# Altium PCB DIO_8SMA_8MCX.PcbDoc (part 6 of 9)
Units mm, origin at the board's own origin, x right, y up, seen from the top; angles counter-clockwise.
Board outline 222.9 x 100 mm, 6 copper layers (TopLayer, L2, L3, L4, L5, Bottom Layer), stack 1.492 mm thick; 542 components, 326 nets, 1968 pads, 1583 vias.
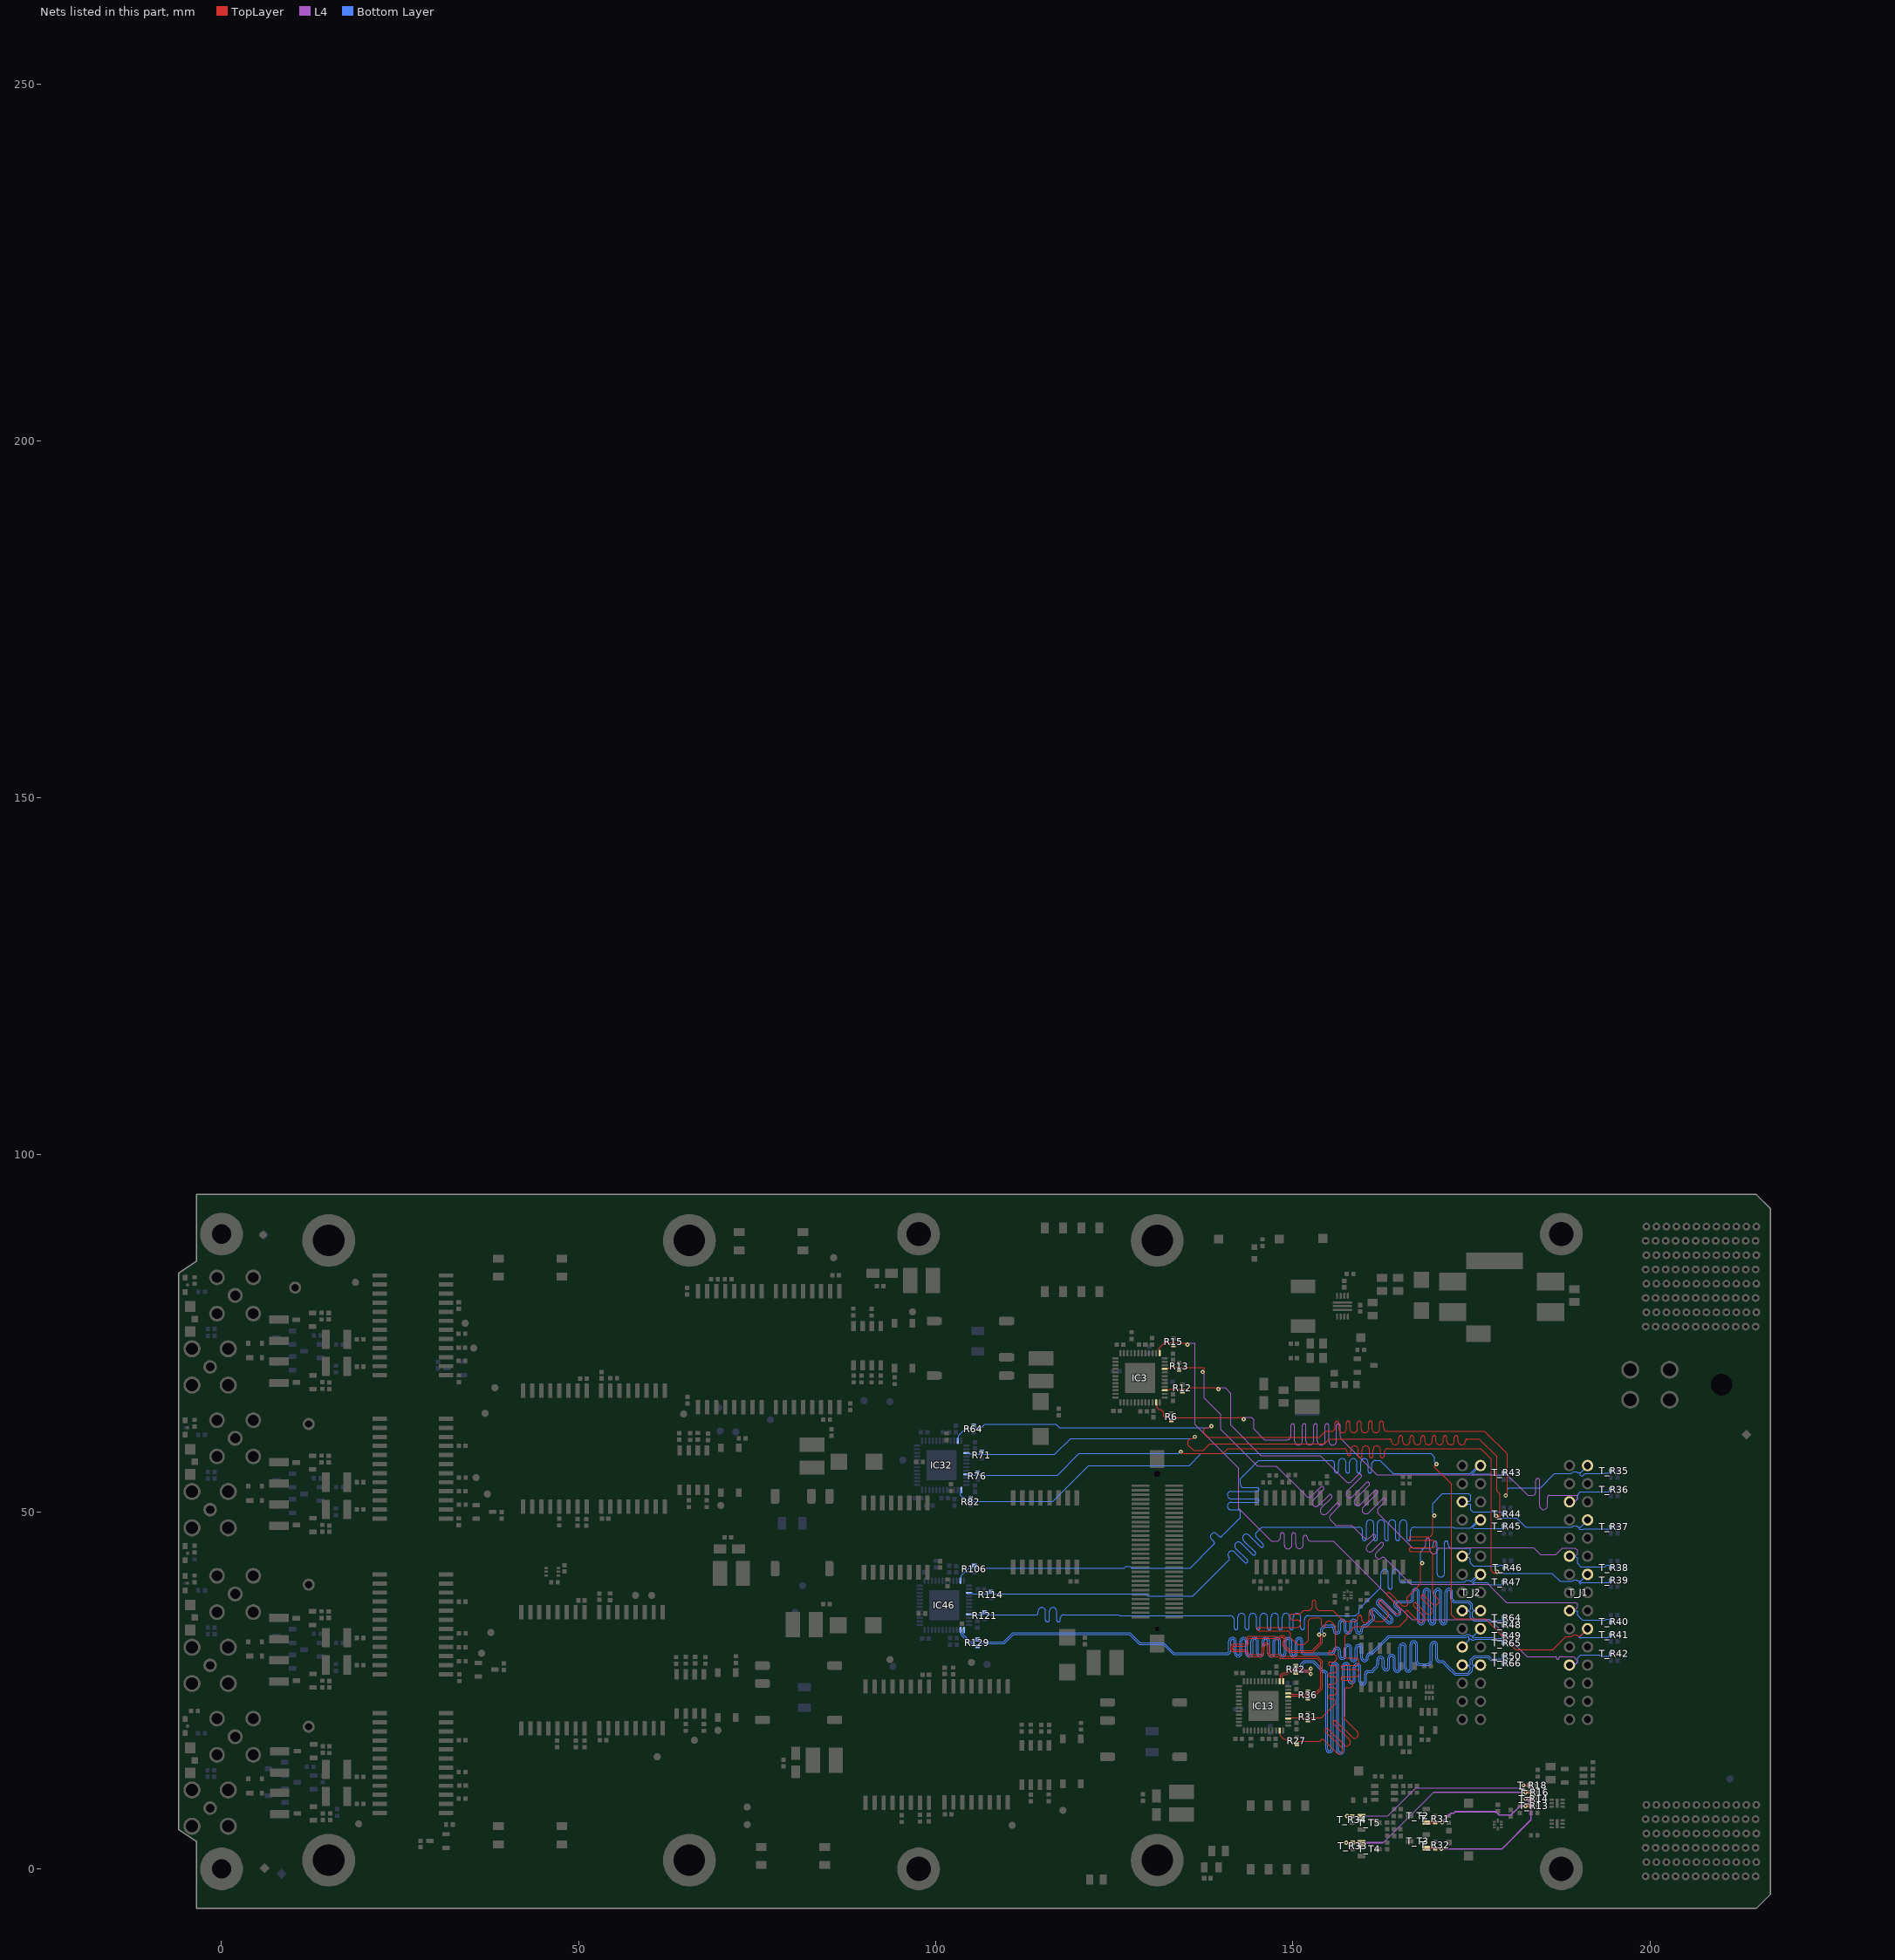
[diagram p9: the nets of this part, all layers, seen from the top]

## Via types
v1: diameter 0.6, hole 0.25, TopLayer to Bottom Layer, tented both sides, 1359 vias
v2: diameter 0.5, hole 0.2, TopLayer to Bottom Layer, tented both sides, 127 vias
v3: diameter 0.6, hole 0.3, TopLayer to Bottom Layer, tented both sides, 45 vias
v4: diameter 0.8, hole 0.3, TopLayer to Bottom Layer, tented both sides, 40 vias
v5: diameter 0.5, hole 0.25, TopLayer to Bottom Layer, tented both sides, 12 vias

## Nets (pads, with @x,y where several pads share a name; then routed paths per layer and width w, separated by ;. In a path a pad name is that pad's centre, name@x,y a point inside that pad or via, vN(x,y) a via of type N, cw(c..) or ccw(c..) an arc to the next point about the centre after c; other vN are vias at no path point) (continued)
EEM_IO.LVDS_N13: IC13.10 R36.2 T_J2.18 T_R64.2 | length 121.6
  TopLayer w0.116: 148.19,32.5 148.123,32.436 cw(c147.944,32.621) 147.762,32.438 147.719,32.481 147.639,32.561 147.611,32.561 143.792,32.561 143.539,32.308 143.539,32.303 143.539,31.717 cw(c143.281,31.717) 143.281,31.459 141.748,31.459 ccw(c141.748,30.94) 141.229,30.94 ccw(c141.748,30.94) 141.748,30.421 143.281,30.421 cw(c143.281,30.163) 143.539,30.163 143.539,30.092 143.657,29.974 143.892,29.739 145.245,29.739 145.433,29.739 ccw(c145.433,30.258) 145.952,30.258 145.952,31.088 cw(c146.21,31.088) 146.468,31.088 146.468,30.258 ccw(c146.987,30.258) 146.987,29.739 147.974,29.739 148,29.739 148.108,29.631 148.239,29.5 153.329,29.5 153.9,28.929 153.9,25.369 152.98,24.45 152.439,24.45 152.371,24.518 152.371,24.557 152.139,24.789 R36.2@152.119,24.789 152.099,24.789 151.867,24.557 151.867,24.518 151.799,24.45 151.19,24.45 149.81,24.449 149.69,24.569 IC13.10@149.35,24.569 ; 148.191,32.501 cw(c148.552,32.128) 148.925,32.489 cw(c148.552,32.128) 148.913,31.755 148.863,31.708 ccw(c149.043,31.522) 148.86,31.34 149.209,30.991 149.306,30.894 149.6,30.6 152.697,30.6 153.9,31.803 153.9,32.49 153.67,32.72 v1(153.67,32.8)
  Bottom Layer w0.116: v1(153.67,32.8) 153.67,32.88 153.9,33.11 153.9,33.63 154.43,34.161 154.661,34.161 155.386,34.161 cw(c155.386,33.642) 155.905,33.642 155.905,33.419 ccw(c156.163,33.419) 156.421,33.419 156.421,34.422 cw(c156.94,34.422) 157.459,34.422 157.459,33.419 ccw(c157.717,33.419) 157.975,33.419 157.975,34.422 ; 157.975,34.422 cw(c158.494,34.422) 159.013,34.422 159.013,33.419 ccw(c159.271,33.419) 159.529,33.419 159.529,33.642 cw(c160.048,33.642) 160.048,34.161 160.236,34.161 160.264,34.161 160.28,34.176 160.375,34.271 161.131,35.027 ccw(c160.948,35.209) 161.13,35.392 ; 161.13,35.393 160.937,35.585 cw(c161.304,35.952) 160.936,36.318 160.938,36.32 cw(c161.304,35.952) 161.671,36.319 163.342,34.649 ccw(c163.524,34.831) 163.707,34.649 ccw(c163.524,34.831) 163.707,35.014 161.825,36.895 cw(c162.192,37.262) 161.825,37.629 cw(c162.192,37.262) 162.559,37.629 164.44,35.748 ccw(c164.623,35.93) 164.805,35.748 ccw(c164.623,35.93) 164.805,36.112 164.243,36.675 cw(c164.61,37.042) 164.61,37.561 164.907,37.561 165.196,37.561 166.419,37.561 ccw(c166.419,37.819) 166.677,37.819 166.677,38.76 cw(c167.196,38.76) 167.715,38.76 167.715,34.703 ccw(c167.973,34.703) 168.231,34.703 168.231,38.76 cw(c168.75,38.76) 169.269,38.76 169.269,34.703 ccw(c169.527,34.703) 169.785,34.703 169.785,38.76 cw(c170.304,38.76) 170.823,38.76 170.823,34.703 ccw(c171.081,34.703) 171.338,34.703 171.338,38.76 cw(c171.857,38.76) 172.376,38.76 172.376,37.819 ccw(c172.634,37.819) 172.634,37.561 173.6,37.561 174.647,37.561 175.173,37.035 175.173,36.358 175.364,36.167 176.264,36.167 T_J2.18@176.27,36.16 ; 175.355,36.16 175.135,35.94 175.135,35.268 175.439,34.965 177.427,34.965 177.585,34.806 179.23,34.806 179.298,34.874 179.298,34.944 T_R64.2@179.53,35.176
EEM_IO.LVDS_N14: IC46.14 R129.2 T_J2.21 T_R65.2 | length 121.2
  Bottom Layer w0.116: IC46.14@103.459,33.461 103.459,33.121 103.579,33.001 103.579,32.698 104.744,31.533 105.485,31.533 105.826,31.191 R129.2@105.866,31.191 ; R129.2@105.846,31.191 R129.2@105.866,31.191 ; T_J2.21@173.73,31.08 174.683,32.033 ; T_R65.2@179.53,31.626 179.298,31.858 179.298,31.953 179.23,32.02 178.821,32.02 178.192,32.02 178.073,32.139 175.486,32.139 175.413,32.065 175.1,32.065 174.956,32.21 174.86,32.21 174.683,32.033 ; R129.2@105.866,31.191 106.098,31.423 106.098,31.463 106.166,31.531 109.6,31.531 110.885,32.815 127.085,32.815 128.492,31.408 131.823,31.408 133.231,30 140.588,30 140.776,30 ccw(c140.776,30.519) 141.295,30.519 141.295,31.895 cw(c141.553,31.895) 141.811,31.895 141.811,30.2 ccw(c142.33,30.2) 142.849,30.2 142.849,31.895 cw(c143.107,31.895) 143.365,31.895 143.365,30.2 ccw(c143.884,30.2) 144.403,30.2 144.403,31.895 cw(c144.661,31.895) 144.919,31.895 144.919,30.2 ccw(c145.438,30.2) 145.957,30.2 145.957,31.895 cw(c146.215,31.895) 146.473,31.895 146.473,30.2 ccw(c146.992,30.2) 147.511,30.2 147.511,31.895 cw(c147.769,31.895) 148.027,31.895 148.027,30.2 ccw(c148.546,30.2) 149.065,30.2 149.065,31.895 cw(c149.323,31.895) 149.581,31.895 149.581,30.2 ccw(c150.1,30.2) 150.619,30.2 150.619,31.895 cw(c150.877,31.895) 151.135,31.895 151.135,30.519 ccw(c151.654,30.519) 151.654,30 152.951,30 154.737,30 155.388,30 ccw(c155.388,30.519) 155.907,30.519 cw(c156.165,30.519) 156.423,30.519 156.423,29.839 ccw(c156.942,29.839) 157.461,29.839 157.461,30.914 cw(c157.719,30.914) 157.977,30.914 157.977,29.519 ccw(c158.496,29.519) 159.015,29.519 159.015,30.914 cw(c159.273,30.914) 159.531,30.914 159.531,29.519 ccw(c160.05,29.519) 160.569,29.519 160.569,29.742 cw(c160.827,29.742) 160.827,30 161.015,30 161.124,30 163.505,32.381 174.243,32.381 174.413,32.551 174.615,32.551 174.683,32.483 174.683,32.033
EEM_IO.LVDS_N15: IC13.14 R42.2 T_J2.24 T_R66.1 | length 122.6
  TopLayer w0.116: IC13.14@148.15,26.269 148.15,26.609 148.27,26.729 148.27,27.173 148.577,27.48 149.024,27.48 149.593,28.05 150.099,28.05 150.167,28.118 150.167,28.157 150.399,28.389 150.439,28.389 150.671,28.157 150.671,28.118 150.739,28.05 151.37,28.05 151.603,27.817 152.19,27.817 152.42,28.047 v1(152.5,28.047)
  Bottom Layer w0.116: v1(152.5,28.047) 152.42,28.047 152.19,27.817 151.671,27.817 151.373,28.114 151.373,28.573 151.7,28.9 152.8,28.9 153.658,28.042 153.716,27.984 154.176,27.524 154.347,27.524 cw(c154.347,27.266) 154.605,27.266 154.605,16.793 ccw(c155.124,16.793) 155.643,16.793 155.643,28.359 cw(c155.901,28.359) 156.159,28.359 156.159,16.592 ccw(c156.678,16.592) 157.197,16.592 157.197,28.359 cw(c157.455,28.359) 157.713,28.359 157.713,26.47 ccw(c158.232,26.47) 158.751,26.47 158.751,28.245 cw(c159.009,28.245) 159.267,28.245 159.267,26.251 ccw(c159.786,26.251) 160.305,26.251 160.305,27.266 cw(c160.563,27.266) 160.563,27.524 160.752,27.524 161.169,27.524 161.499,27.854 161.781,28.136 ; 161.781,28.136 ccw(c161.219,28.696) 162.013,28.696 162.013,29.245 cw(c162.271,29.245) 162.271,29.503 cw(c162.271,29.245) 162.529,29.245 162.529,28.247 ccw(c163.048,28.247) 163.048,27.728 ccw(c163.048,28.247) 163.567,28.247 163.567,29.523 cw(c163.825,29.523) 163.825,29.781 cw(c163.825,29.523) 164.083,29.523 164.083,28.047 ccw(c164.602,28.047) 164.602,27.528 ccw(c164.602,28.047) 165.121,28.047 165.121,31.077 cw(c165.379,31.077) 165.379,31.335 cw(c165.379,31.077) 165.637,31.077 165.637,28.069 ccw(c166.156,28.069) 166.156,27.55 ccw(c166.156,28.069) 166.675,28.069 166.675,31.432 cw(c166.933,31.432) 166.933,31.69 cw(c166.933,31.432) 167.191,31.432 167.191,29.019 ccw(c167.71,29.019) 167.71,28.5 168.06,28.5 168.303,28.5 168.807,28.5 169.069,28.5 169.362,28.793 ccw(c168.995,29.16) 169.514,29.16 169.514,31.32 cw(c169.772,31.32) 170.03,31.32 170.03,29.417 ccw(c170.549,29.417) 170.549,28.898 170.933,28.898 171.457,28.373 171.631,28.2 172.692,27.139 174.578,27.139 175.131,27.692 175.131,28.2 175.364,28.433 176.164,28.433 T_J2.24@176.27,28.54 175.199,28.54 175.131,28.608 175.131,29.2 175.531,29.6 177.3,29.6 177.731,29.169 179.23,29.169 179.298,29.102 179.298,29.032 T_R66.1@179.53,28.8
EEM_IO.LVDS_P0: IC32.47 R64.1 T_J1.2 T_R35.2 | length 120.9
  TopLayer w0.116: v1(138.599,62.02) 138.519,62.02 138.289,61.79 138.158,61.79 138.157,61.791 137.746,61.791 137.526,61.571 137.526,61.035 138.137,60.424 153.724,60.424 154.6,61.3 155.233,61.3 155.421,61.3 ccw(c155.421,61.819) 155.94,61.819 155.94,62.447 cw(c156.198,62.447) 156.456,62.447 156.456,61.605 ccw(c156.975,61.605) 157.494,61.605 157.494,62.447 cw(c157.752,62.447) 158.01,62.447 158.01,61.605 ccw(c158.529,61.605) 159.048,61.605 159.048,62.447 cw(c159.306,62.447) 159.564,62.447 159.564,61.605 ccw(c160.083,61.605) 160.602,61.605 160.602,62.447 cw(c160.86,62.447) 161.118,62.447 161.118,61.605 ccw(c161.637,61.605) 162.156,61.605 162.156,62.447 cw(c162.414,62.447) 162.672,62.447 162.672,61.819 ccw(c163.191,61.819) 163.191,61.3 165.711,61.3 176.828,61.3 180.028,58.1 180.028,52.61 179.799,52.38 v1(179.799,52.3)
  Bottom Layer w0.116: IC32.47@103.093,59.958 103.093,60.299 103.212,60.418 103.212,60.69 104.252,61.731 104.98,61.731 105.048,61.798 105.048,61.838 105.28,62.07 R64.1@105.3,62.07 105.32,62.07 105.552,61.838 105.552,61.798 105.62,61.731 106.3,61.731 106.87,62.3 116.8,62.3 117.31,61.79 137.788,61.79 138.289,61.79 138.519,62.02 v1(138.599,62.02) ; v1(179.799,52.3) 179.828,52.3 180.028,52.5 ; v1@180.028,52.417 180.028,52.5 ; T_J1.2@191.27,56.48 190.287,55.497 ; T_R35.2@194.53,55.75 194.298,55.518 194.298,55.473 194.23,55.405 193.727,55.405 193.68,55.359 190.937,55.359 190.557,54.979 190.415,54.979 190.247,55.147 190.247,55.457 190.287,55.497 ; 180.028,52.5 180.028,53.14 180.249,53.361 184.679,53.361 186.669,55.351 188.984,55.351 189.275,55.642 189.753,55.642 189.897,55.497 190.287,55.497
EEM_IO.LVDS_P1: IC3.47 R6.1 T_J1.5 T_R36.2 | length 107.5
  TopLayer w0.116: IC3.47@130.858,65.317 130.858,64.976 130.978,64.857 130.978,64.585 131.199,64.364 131.467,64.364 131.881,63.95 131.881,63.457 132.168,63.17 132.68,63.17 132.748,63.102 132.748,63.062 132.98,62.83 R6.1@133,62.83 133.02,62.83 133.252,63.062 133.252,63.102 133.32,63.17 142.289,63.17 142.349,63.23 142.79,63.23 143.02,63 v1(143.1,63)
  L4 w0.127: v1(143.1,63) 143.187,63 143.411,63.224 144.191,63.224 144.528,62.887 144.528,61.616 146.044,60.1 148.985,60.1 149.184,60.1 ccw(c149.184,60.635) 149.72,60.635 149.72,62.062 cw(c149.983,62.062) 149.983,62.325 cw(c149.983,62.062) 150.247,62.062 150.247,59.894 ccw(c150.782,59.894) 150.782,59.358 ccw(c150.782,59.894) 151.318,59.894 151.318,62.062 cw(c151.581,62.062) 151.581,62.325 cw(c151.581,62.062) 151.845,62.062 151.845,59.894 ccw(c152.38,59.894) 152.38,59.358 ccw(c152.38,59.894) 152.916,59.894 152.916,62.062 cw(c153.179,62.062) 153.179,62.325 cw(c153.179,62.062) 153.443,62.062 153.443,59.894 ccw(c153.978,59.894) 153.978,59.358 ccw(c153.978,59.894) 154.514,59.894 154.514,62.062 cw(c154.777,62.062) 154.777,62.325 cw(c154.777,62.062) 155.041,62.062 155.041,59.894 ccw(c155.576,59.894) 155.576,59.358 ccw(c155.576,59.894) 156.112,59.894 156.112,62.062 cw(c156.375,62.062) 156.375,62.325 cw(c156.375,62.062) 156.639,62.062 156.639,60.583 ccw(c157.174,60.583) 156.796,60.204 157.575,59.425 157.705,59.295 161.804,55.196 180.004,55.196 181.8,53.4 182.9,52.3 183.305,52.3 183.504,52.3 ccw(c183.504,52.836) 184.04,52.836 184.04,54.41 cw(c184.303,54.41) 184.303,54.673 cw(c184.303,54.41) 184.567,54.41 184.567,50.842 ccw(c185.102,50.842) 185.102,50.306 ccw(c185.102,50.842) 185.638,50.842 185.638,52.037 cw(c185.901,52.037) 185.901,52.3 186.954,52.3 189.79,52.3 189.864,52.226 189.864,51.8 189.646,51.582 188.912,51.582 T_J1.5@188.73,51.4
  Bottom Layer w0.116: T_J1.5@188.73,51.4 188.897,51.567 189.636,51.567 189.87,51.8 189.87,52.408 190.252,52.791 194.227,52.791 194.295,52.859 194.295,52.889 T_R36.2@194.527,53.121
EEM_IO.LVDS_P2: IC32.3 R71.1 T_J1.8 T_R37.2 | length 120.7
  TopLayer w0.116: v1(136.3,60.5) 136.22,60.5 135.99,60.271 135.657,60.271 135.344,59.958 135.344,59.37 136.123,58.592 137.471,58.592 138.403,59.524 154.424,59.524 155.1,60.2 162.804,60.2 163.555,60.2 cw(c163.555,59.942) 163.813,59.942 163.813,59.925 ccw(c164.332,59.925) 164.851,59.925 164.851,60.408 cw(c165.109,60.408) 165.367,60.408 165.367,59.91 ccw(c165.886,59.91) 166.405,59.91 166.405,60.408 cw(c166.663,60.408) 166.921,60.408 166.921,59.91 ccw(c167.44,59.91) 167.959,59.91 167.959,60.408 cw(c168.217,60.408) 168.475,60.408 168.475,59.91 ccw(c168.994,59.91) 169.513,59.91 169.513,60.408 cw(c169.771,60.408) 170.029,60.408 170.029,59.91 ccw(c170.548,59.91) 171.067,59.91 171.067,60.408 cw(c171.325,60.408) 171.583,60.408 171.583,59.91 ccw(c172.102,59.91) 172.621,59.91 172.621,60.408 cw(c172.879,60.408) 173.137,60.408 173.137,59.91 ccw(c173.656,59.91) 174.175,59.91 174.175,59.942 cw(c174.433,59.942) 174.433,60.2 174.621,60.2 176.1,60.2 178.554,57.746 178.554,52.946 179,52.5 179,49.371 179.009,49.362 179.009,49.229 178.941,49.161 178.81,49.161 178.58,49.391 v1(178.5,49.391)
  Bottom Layer w0.116: IC32.3@104.293,58.258 104.633,58.258 104.753,58.139 105.326,58.139 105.419,58.046 106.008,58.046 ; R71.1@106.154,58.191 106.008,58.046 ; R71.1@106.191,58.153 106.191,58.114 106.123,58.046 106.008,58.046 ; R71.1@106.443,58.385 106.463,58.385 106.695,58.153 106.695,58.114 106.763,58.046 116.646,58.046 118.871,60.271 135.99,60.271 136.22,60.5 v1(136.3,60.5) ; v1(178.5,49.391) 178.631,49.391 178.86,49.161 181.339,49.161 182.618,47.882 189.135,47.882 189.285,48.032 189.743,48.032 189.887,47.887 190.297,47.887 ; T_J1.8@191.27,48.86 190.297,47.887 ; T_R37.2@194.53,47.9 194.53,47.88 194.23,47.58 194.053,47.58 193.996,47.637 190.697,47.637 190.625,47.565 190.209,47.565 190.14,47.634 190.14,47.73 190.297,47.887
EEM_IO.LVDS_P3: IC3.3 R12.1 T_J1.11 T_R38.2 | length 106.4
  TopLayer w0.116: IC3.3@132.058,67.017 132.399,67.017 132.518,67.136 133.721,67.136 133.812,67.227 134.222,67.227 134.29,67.159 134.29,67.12 134.522,66.888 R12.1@134.542,66.888 134.562,66.888 134.794,67.12 134.794,67.159 134.862,67.227 135.215,67.227 135.393,67.406 139.29,67.406 139.52,67.176 v1(139.6,67.176)
  L4 w0.127: v1(139.6,67.176) 139.676,67.176 139.9,67.4 140.5,67.4 141.328,66.572 141.328,62.128 145.556,57.9 153.815,57.9 157.315,54.4 157.417,54.299 157.456,54.26 ccw(c157.835,54.638) 158.214,54.259 159.172,55.217 ; 159.172,55.218 cw(c159.359,55.031) 159.545,55.218 cw(c159.359,55.031) 159.545,54.845 157.559,52.859 157.559,52.854 ccw(c157.977,52.52) 158.356,52.141 160.302,54.087 cw(c160.489,53.901) 160.675,54.088 cw(c160.489,53.901) 160.675,53.715 158.689,51.729 158.689,51.724 ccw(c159.107,51.39) 159.486,51.011 161.432,52.957 cw(c161.619,52.771) 161.805,52.958 cw(c161.619,52.771) 161.805,52.585 159.819,50.599 159.819,50.594 ccw(c160.237,50.26) 160.616,49.881 162.562,51.827 ; 162.562,51.828 cw(c162.749,51.641) 162.935,51.828 cw(c162.749,51.641) 162.935,51.455 161.976,50.496 ccw(c162.355,50.118) 161.977,49.738 162.606,49.109 162.708,49.008 166.787,44.928 167.908,44.928 168.107,44.928 ccw(c168.107,45.463) 168.643,45.463 168.643,46.05 cw(c168.906,46.05) 168.906,46.313 cw(c168.906,46.05) 169.17,46.05 169.17,44.664 ccw(c169.705,44.664) 169.705,44.129 ccw(c169.705,44.664) 170.241,44.664 cw(c170.504,44.665) 170.504,44.928 172.142,44.928 174.213,44.928 174.263,44.978 183.709,44.978 184.687,44 186.827,44 187.74,44.913 189.541,44.913 189.864,44.59 189.864,44.1 189.721,43.957 188.907,43.957 T_J1.11@188.73,43.78
  Bottom Layer w0.116: T_J1.11@188.73,43.78 188.777,43.733 189.636,43.733 189.87,43.5 189.87,42.761 190.302,42.329 193.729,42.329 193.933,42.532 194.23,42.532 194.298,42.464 194.298,42.432 T_R38.2@194.53,42.2
EEM_IO.LVDS_P4: IC32.9 R76.1 T_J1.14 T_R39.2 | length 120.7
  TopLayer w0.116: v1(134.3,58.42) 134.38,58.42 134.61,58.19 140.197,58.19 140.868,58.861 156.331,58.861 157.096,58.861 cw(c157.096,58.342) 157.615,58.342 157.615,58.129 ccw(c157.873,58.129) 158.131,58.129 158.131,58.7 cw(c158.65,58.7) 159.169,58.7 159.169,57.825 ccw(c159.427,57.825) 159.685,57.825 159.685,58.7 cw(c160.204,58.7) 160.723,58.7 160.723,57.825 ccw(c160.981,57.825) 161.238,57.825 161.238,58.7 cw(c161.757,58.7) 162.276,58.7 162.276,57.825 ccw(c162.534,57.825) 162.792,57.825 162.792,58.342 cw(c163.311,58.342) 163.311,58.861 163.5,58.861 176.308,58.861 177.8,57.369 177.8,41.75 178.159,41.39 178.29,41.39 178.52,41.62 v1(178.6,41.62)
  Bottom Layer w0.116: IC32.9@104.293,55.258 104.633,55.258 104.753,55.139 105.523,55.139 105.591,55.207 105.591,55.246 105.823,55.478 R76.1@105.843,55.478 ; R76.1@106.038,55.303 106.095,55.246 106.095,55.207 106.163,55.139 117.039,55.139 120.09,58.19 133.99,58.19 134.22,58.42 v1(134.3,58.42) ; v1(178.6,41.62) 178.68,41.62 178.91,41.39 186.279,41.39 187.407,40.262 189.135,40.262 189.345,40.472 189.683,40.472 189.802,40.353 190.342,40.353 ; T_J1.14@191.27,41.24 190.14,40.11 190.14,40.014 190.208,39.946 190.304,39.946 190.439,40.08 194.23,40.08 194.298,40.148 194.298,40.243 T_R39.2@194.53,40.475
EEM_IO.LVDS_P5: IC3.9 R13.1 T_J1.17 T_R40.2 | length 105.6
  TopLayer w0.116: IC3.9@132.058,70.017 132.399,70.017 132.518,70.136 133.017,70.136 133.15,70.269 133.78,70.269 133.848,70.202 133.848,70.162 134.08,69.93 R13.1@134.1,69.93 ; R13.1@134.372,70.209 137.542,70.209 137.61,70.141 137.61,69.91 137.38,69.68 v1(137.38,69.6)
  L4 w0.127: v1(137.38,69.6) 137.38,69.513 137.604,69.289 137.604,65.911 139.92,63.595 139.92,61.559 145.051,56.428 147.672,56.428 151.75,52.35 151.891,52.209 ccw(c152.27,52.587) 152.649,52.209 153.915,53.475 cw(c154.101,53.288) 154.288,53.475 cw(c154.101,53.288) 154.288,53.103 152.849,51.664 ccw(c153.228,51.285) 152.849,50.907 ; 152.85,50.906 ccw(c153.228,51.285) 153.607,50.907 ; 153.607,50.907 155.045,52.345 cw(c155.231,52.158) 155.417,52.345 cw(c155.231,52.158) 155.418,51.973 153.979,50.534 ccw(c154.358,50.155) 153.979,49.777 ccw(c154.358,50.155) 154.737,49.777 156.117,51.157 cw(c156.303,50.97) 156.489,51.157 cw(c156.303,50.97) 156.489,50.784 155.281,49.576 ccw(c155.66,49.197) 155.281,48.819 155.83,48.27 155.98,48.12 158.258,48.12 159.857,46.521 159.958,46.42 159.997,46.381 ccw(c160.376,46.759) 160.755,46.38 161.152,46.777 ; 161.152,46.778 cw(c161.339,46.591) 161.525,46.778 cw(c161.339,46.591) 161.525,46.405 160.381,45.261 160.381,45.256 ccw(c160.799,44.922) 161.178,44.543 162.265,45.63 cw(c162.451,45.444) 162.637,45.63 cw(c162.451,45.444) 162.637,45.257 161.693,44.313 ccw(c162.071,43.934) 161.693,43.555 ccw(c162.071,43.934) 162.45,43.555 cw(c162.636,43.369) 162.823,43.555 163.211,43.167 163.313,43.066 166.552,39.826 177.389,39.826 177.708,39.508 179.915,37.3 182.996,37.3 186.762,37.3 189.643,37.3 189.864,37.079 189.864,36.6 189.646,36.382 188.952,36.382 T_J1.17@188.73,36.16
  Bottom Layer w0.116: T_J1.17@188.73,36.16 189.802,36.16 189.87,36.092 189.87,35.53 190.571,34.829 193.729,34.829 193.844,34.944 194.23,34.944 194.298,34.877 194.298,34.832 T_R40.2@194.53,34.6
EEM_IO.LVDS_P6: IC32.13 R82.1 T_J1.20 T_R41.2 | length 122.9
  TopLayer w0.116: v1(170.1,56.7) 170.1,56.62 169.871,56.39 169.871,56.229 172.2,53.9 172.2,35.6 172.8,35 176.9,35 181.2,30.7 186.41,30.7 188.23,32.52 189.014,32.52 189.255,32.762 189.773,32.762 189.917,32.617 190.267,32.617 T_J1.20@191.27,33.62
  Bottom Layer w0.116: IC32.13@103.593,53.058 103.593,52.718 103.473,52.598 103.473,52.327 103.703,52.097 103.889,52.097 104.169,51.817 104.169,51.571 104.237,51.503 104.588,51.503 104.656,51.571 104.656,51.576 104.888,51.808 104.928,51.808 105.16,51.576 105.16,51.537 105.228,51.469 116.4,51.469 121.431,56.5 135.5,56.5 137.175,58.175 169.325,58.175 169.847,57.653 169.847,57.01 170.076,56.78 170.1,56.78 v1(170.1,56.7) ; T_J1.20@191.27,33.62 190.14,32.49 190.14,32.394 190.208,32.326 190.304,32.326 190.366,32.388 194.142,32.388 194.225,32.471 194.225,32.475 T_R41.2@194.53,32.78
EEM_IO.LVDS_P7: IC3.13 R15.1 T_J1.23 T_R42.2 | length 105.9
  TopLayer w0.116: IC3.13@131.358,72.217 131.358,72.557 131.239,72.677 131.239,72.9 132.039,73.7 132.631,73.7 132.662,73.669 132.98,73.669 133.048,73.602 133.048,73.562 133.28,73.33 133.32,73.33 133.552,73.562 133.552,73.602 133.62,73.669 134.246,73.669 134.273,73.642 134.918,73.642 135.148,73.412 v1(135.228,73.412)
  L4 w0.127: v1(135.228,73.412) 135.315,73.412 135.55,73.647 136.226,73.647 136.3,73.573 136.3,72.458 136.3,62.234 142.428,56.106 142.428,50.459 146.987,45.9 147.54,45.9 147.74,45.9 ccw(c147.74,46.435) 148.275,46.435 148.275,46.801 cw(c148.539,46.801) 148.539,47.064 cw(c148.539,46.801) 148.802,46.801 148.802,45.363 ccw(c149.338,45.363) 149.338,44.827 ccw(c149.338,45.363) 149.873,45.363 149.873,46.801 cw(c150.137,46.801) 150.137,47.064 cw(c150.137,46.801) 150.4,46.801 150.4,45.4 ccw(c150.936,45.4) 150.936,44.865 ccw(c150.936,45.4) 151.471,45.4 151.471,46.436 cw(c151.735,46.436) 151.735,46.699 cw(c151.735,46.436) 151.998,46.436 ccw(c152.534,46.435) 152.534,45.9 153.184,45.9 155.7,45.9 166.695,34.905 177.595,34.905 178.2,34.3 182.8,29.7 186.374,29.7 186.765,29.7 cw(c186.765,29.537) 186.928,29.537 186.928,29.5 ccw(c187.092,29.5) 187.255,29.5 187.255,29.537 cw(c187.419,29.537) 187.419,29.7 187.665,29.7 189.3,29.7 189.684,29.316 189.864,29.136 189.864,28.9 189.646,28.682 188.872,28.682 T_J1.23@188.73,28.54
  Bottom Layer w0.116: T_J1.23@188.73,28.54 188.957,28.767 189.636,28.767 189.87,29 189.87,29.52 190.293,29.943 192.92,29.943 193.065,29.799 194.213,29.799 194.278,29.864 194.298,29.864 194.53,30.096 T_R42.2@194.53,30.116
EEM_IO.LVDS_P8: IC46.47 R106.1 T_J2.2 T_R43.2 | length 122.3
  Bottom Layer w0.116: IC46.47@103.459,40.361 103.459,40.702 103.579,40.821 103.579,41.054 104.655,42.13 105.08,42.13 105.148,42.198 105.148,42.238 105.38,42.47 R106.1@105.4,42.47 105.42,42.47 105.652,42.238 105.652,42.198 105.72,42.13 126.385,42.13 126.594,42.339 127.206,42.339 127.415,42.13 135.631,42.13 138.825,45.325 138.958,45.458 ccw(c138.776,45.64) 138.958,45.823 138.604,46.177 cw(c138.971,46.544) 138.604,46.911 cw(c138.971,46.544) 139.338,46.911 139.692,46.557 ccw(c139.874,46.739) 140.057,46.557 140.543,47.043 142.378,48.878 142.621,49.121 142.639,49.139 142.639,50.022 ccw(c142.381,50.022) 142.381,50.28 141.357,50.28 cw(c141.357,50.799) 141.357,51.318 145.008,51.318 ccw(c145.008,51.576) 145.008,51.834 141.357,51.834 cw(c141.357,52.353) 141.357,52.872 145.008,52.872 ccw(c145.008,53.13) 145.008,53.388 143.158,53.388 cw(c143.158,53.907) 142.639,53.907 142.639,54.095 142.639,54.608 145.231,57.2 153.773,57.2 155.351,57.2 cw(c155.351,56.681) 155.87,56.681 155.87,55.7 ccw(c156.128,55.7) 156.386,55.7 156.386,56.923 cw(c156.905,56.923) 157.424,56.923 157.424,55.7 ccw(c157.682,55.7) 157.94,55.7 157.94,56.923 cw(c158.459,56.923) 158.978,56.923 158.978,55.7 ccw(c159.236,55.7) 159.494,55.7 159.494,56.923 cw(c160.013,56.923) 160.532,56.923 160.532,55.7 ccw(c160.79,55.7) 161.048,55.7 161.048,56.681 cw(c161.567,56.681) 161.567,57.2 161.756,57.2 162.203,57.2 164.042,55.361 174.823,55.361 175.942,56.48 T_J2.2@176.27,56.48 175.14,55.35 175.14,55.254 175.208,55.186 175.304,55.186 175.418,55.3 177.706,55.3 177.9,55.106 178.73,55.106 179.23,55.106 179.298,55.174 179.298,55.244 T_R43.2@179.53,55.476
EEM_IO.LVDS_P9: IC13.47 R27.1 T_J2.5 T_R44.2 | length 122.6
  TopLayer w0.116: IC13.47@148.15,19.369 148.15,19.029 148.27,18.909 148.27,18.572 148.684,18.158 149.119,18.158 149.45,17.826 150.185,17.826 150.528,17.483 R27.1@150.548,17.483 150.568,17.483 150.8,17.715 150.8,17.755 150.906,17.861 153.055,17.861 153.761,17.861 153.935,18.035 cw(c154.117,17.852) 154.3,18.034 ; 154.3,18.034 156.077,16.258 ccw(c156.444,16.625) 156.811,16.258 ccw(c156.444,16.625) 156.811,16.992 154.593,19.21 cw(c154.775,19.392) 154.593,19.574 cw(c154.775,19.392) 154.958,19.574 157.175,17.357 ccw(c157.542,17.724) 157.908,17.355 157.911,17.358 ccw(c157.542,17.724) 157.909,18.091 155.692,20.308 cw(c155.874,20.491) 155.692,20.673 cw(c155.874,20.491) 156.056,20.673 158.274,18.455 ccw(c158.641,18.822) 159.007,18.454 159.009,18.456 ccw(c158.641,18.822) 159.008,19.189 157.231,20.966 cw(c157.414,21.149) 157.231,21.331 157.3,21.4 157.3,21.529 157.3,24.236 157.3,25.112 cw(c157.558,25.112) 157.558,25.37 157.903,25.37 ccw(c157.903,25.889) 157.903,26.408 157.023,26.408 cw(c157.023,26.666) 157.023,26.924 158.755,26.924 ccw(c158.755,27.443) 158.755,27.962 157.023,27.962 cw(c157.023,28.22) 157.023,28.478 158.755,28.478 ccw(c158.755,28.997) 158.755,29.516 157.558,29.516 cw(c157.558,29.774) 157.3,29.774 157.3,29.962 157.3,32.639 158.598,33.937 164.906,33.937 164.946,33.977 165.041,34.072 165.893,34.924 ccw(c165.526,35.291) 165.931,35.615 165.931,35.62 165.893,35.657 ; 165.893,35.658 165.818,35.733 cw(c166,35.916) 165.818,36.098 cw(c166,35.916) 166.183,36.098 167.599,34.682 ccw(c167.966,35.049) 168.331,34.681 168.334,34.683 ccw(c167.966,35.049) 168.333,35.416 166.916,36.832 cw(c167.099,37.014) 166.916,37.197 cw(c167.099,37.014) 167.281,37.197 168.697,35.781 ccw(c169.064,36.148) 169.43,35.78 169.432,35.782 ccw(c169.064,36.148) 169.431,36.515 168.015,37.931 cw(c168.198,38.113) 168.015,38.296 cw(c168.198,38.113) 168.38,38.296 169.561,37.115 ccw(c169.928,37.482) 170.294,37.114 170.296,37.116 ccw(c169.928,37.482) 170.295,37.849 169.726,38.418 cw(c170.103,38.794) 169.571,38.795 169.571,38.93 169.571,43.209 169.571,43.942 ccw(c169.052,43.942) 169.052,44.461 166.532,44.461 cw(c166.532,44.719) 166.532,44.977 169.523,44.977 ccw(c169.523,45.496) 169.523,46.015 166.532,46.015 cw(c166.532,46.273) 166.532,46.531 169.052,46.531 ccw(c169.052,47.05) 169.571,47.05 169.571,48.016 169.571,49.19 169.8,49.42 v1(169.8,49.5)
  Bottom Layer w0.116: v1(169.8,49.5) 169.8,49.58 169.571,49.81 169.571,51.171 170.971,52.571 174.636,52.571 174.902,52.306 174.902,51.635 174.733,51.467 173.797,51.467 T_J2.5@173.73,51.4 174.014,51.116 174.774,51.116 174.918,50.972 174.918,50.313 175.232,49.999 179.251,49.999 179.53,49.72 T_R44.2@179.53,49.7
EEM_IO.LVDS_P10: IC46.3 R114.1 T_J2.8 T_R45.2 | length 121.9
  Bottom Layer w0.116: IC46.3@104.659,38.661 105,38.661 105.169,38.492 107.426,38.492 107.494,38.56 107.494,38.599 107.726,38.831 R114.1@107.746,38.831 107.766,38.831 107.998,38.599 107.998,38.56 108.066,38.492 129.408,38.492 129.7,38.2 136,38.2 140.459,42.659 141.071,43.271 ccw(c140.888,43.453) 141.071,43.636 cw(c141.438,44.003) 141.071,44.37 cw(c141.438,44.003) 141.805,44.37 143.25,42.924 ccw(c143.433,43.107) 143.615,43.289 142.013,44.891 cw(c142.379,45.259) 142.012,45.626 cw(c142.379,45.259) 142.703,45.664 142.708,45.664 144.364,44.008 ccw(c144.545,44.192) 144.727,44.009 ccw(c144.545,44.192) 144.727,44.375 143.111,45.99 cw(c143.478,46.358) 143.111,46.725 cw(c143.478,46.358) 143.802,46.763 143.807,46.763 145.462,45.107 ccw(c145.644,45.29) 145.827,45.108 ccw(c145.644,45.29) 145.826,45.473 ; 145.826,45.474 144.917,46.382 cw(c145.284,46.75) 144.917,47.117 145.05,47.25 145.661,47.861 158.286,47.861 159.253,47.861 cw(c159.253,47.342) 159.772,47.342 159.772,46.213 ccw(c160.03,46.213) 160.288,46.213 160.288,48.342 cw(c160.807,48.342) 161.326,48.342 161.326,46.213 ccw(c161.584,46.213) 161.842,46.213 161.842,48.342 cw(c162.361,48.342) 162.88,48.342 162.88,46.213 ccw(c163.138,46.213) 163.396,46.213 163.396,48.342 cw(c163.915,48.342) 164.434,48.342 164.434,46.213 ccw(c164.692,46.213) 164.95,46.213 164.95,48.342 cw(c165.469,48.342) 165.988,48.342 165.988,46.213 ccw(c166.246,46.213) 166.504,46.213 166.504,47.342 cw(c167.023,47.342) 167.023,47.861 167.212,47.861 172.494,47.861 172.609,47.746 174.828,47.746 175.942,48.86 T_J2.8@176.27,48.86 175.245,47.835 175.245,47.739 175.313,47.671 179.245,47.671 179.53,47.956 T_R45.2@179.53,47.976
EEM_IO.LVDS_P11: IC13.3 R31.1 T_J2.11 T_R46.2 | length 122.3
  TopLayer w0.116: IC13.3@149.35,21.069 149.69,21.069 149.81,21.188 151.715,21.188 151.833,21.07 151.867,21.07 R31.1@152.109,20.828 ; R31.1@152.119,20.838 152.139,20.838 152.371,21.07 152.371,21.11 152.439,21.178 154.047,21.178 155.969,23.1 156,23.131 156,23.289 ccw(c155.481,23.289) 155.481,23.808 155.258,23.808 cw(c155.258,24.066) 155,24.066 cw(c155.258,24.066) 155.258,24.324 155.619,24.324 ccw(c155.619,24.842) 156.138,24.842 ccw(c155.619,24.842) 155.619,25.361 155.258,25.361 cw(c155.258,25.619) 155,25.619 cw(c155.258,25.619) 155.258,25.877 155.619,25.877 ccw(c155.619,26.396) 156.138,26.396 ccw(c155.619,26.396) 155.619,26.915 155.258,26.915 cw(c155.258,27.173) 155,27.173 cw(c155.258,27.173) 155.258,27.431 155.619,27.431 ccw(c155.619,27.95) 156.138,27.95 ccw(c155.619,27.95) 155.619,28.469 155.258,28.469 cw(c155.258,28.727) 155,28.727 cw(c155.258,28.727) 155.258,28.985 155.619,28.985 ccw(c155.619,29.504) 156.138,29.504 ccw(c155.619,29.504) 155.619,30.023 155.258,30.023 cw(c155.258,30.281) 155,30.281 cw(c155.258,30.281) 155.258,30.539 155.481,30.539 ccw(c155.481,31.058) 156,31.058 156,31.735 156,31.977 156,33.969 155.797,34.172 155.436,34.533 ccw(c155.069,34.166) 154.55,34.166 154.55,34.162 cw(c154.292,34.162) 154.292,33.904 cw(c154.292,34.162) 154.034,34.162 154.034,34.642 ccw(c153.515,34.642) 153.515,35.161 152.553,35.161 152.549,35.157 152.2,34.808 152.2,32 151.6,31.4 150.669,31.4 149.7,32.369 149.7,32.607 149.7,32.795 ccw(c149.181,32.795) 149.181,33.314 145.282,33.314 cw(c145.282,33.572) 145.282,33.83 150.559,33.83 ccw(c150.559,34.349) 150.559,34.868 149.958,34.868 cw(c149.958,35.126) 149.7,35.126 149.7,35.622 149.768,35.69 150.99,35.69 151.037,35.737 151.084,35.784 151.5,36.2 152.014,36.2 152.203,36.2 ccw(c152.203,36.719) 152.722,36.719 152.722,37.365 cw(c152.98,37.365) 153.238,37.365 153.238,36.719 ccw(c153.757,36.719) 153.757,36.2 154.492,36.2 155.6,36.2 157.161,34.639 158.411,34.639 158.599,34.639 ccw(c158.599,35.158) 159.118,35.158 159.118,35.239 cw(c159.376,35.239) 159.634,35.239 159.634,34.953 ccw(c160.153,34.953) 160.672,34.953 160.672,35.958 cw(c160.93,35.958) 161.188,35.958 161.188,35.158 ccw(c161.707,35.158) 161.707,34.639 162.4,34.639 162.619,34.639 163.138,35.158 163.271,35.291 ccw(c162.904,35.658) 163.271,36.025 162.109,37.188 cw(c162.291,37.37) 162.109,37.553 cw(c162.291,37.37) 162.473,37.553 164.203,35.823 ccw(c164.57,36.19) 164.937,35.823 ccw(c164.57,36.19) 164.937,36.557 163.239,38.255 cw(c163.422,38.437) 163.239,38.619 cw(c163.422,38.437) 163.604,38.619 165.284,36.939 ccw(c165.651,37.306) 166.018,36.939 ccw(c165.651,37.306) 166.018,37.673 ; 166.018,37.674 cw(c166.201,37.856) 166.018,38.038 167.097,39.117 167.87,39.89 167.87,42.49 168.1,42.72 v1(168.1,42.8)
  Bottom Layer w0.116: v1(168.1,42.8) 168.1,42.88 167.87,43.11 167.87,44.371 168.4,44.9 168.402,44.9 169.157,44.9 ccw(c169.157,45.419) 169.676,45.419 169.676,45.642 cw(c169.934,45.642) 170.192,45.642 170.192,41.389 ccw(c170.711,41.389) 171.23,41.389 171.23,45.642 cw(c171.488,45.642) 171.746,45.642 171.746,45.419 ccw(c172.265,45.419) 172.265,44.9 173.231,44.9 174.77,44.9 174.87,44.8 174.87,44.3 174.613,44.043 173.993,44.043 T_J2.11@173.73,43.78 173.877,43.633 174.636,43.633 174.87,43.4 174.87,42.861 175.292,42.439 178.829,42.439 178.935,42.544 179.33,42.544 179.398,42.477 179.398,42.432 T_R46.2@179.63,42.2
EEM_IO.LVDS_P12: IC46.9 R121.1 T_J2.14 T_R47.2 | length 122.4
  Bottom Layer w0.116: IC46.9@104.659,35.661 105,35.661 105.119,35.542 105.62,35.542 105.67,35.592 106.526,35.592 106.594,35.66 106.594,35.699 106.826,35.931 R121.1@106.846,35.931 106.866,35.931 107.098,35.699 107.098,35.66 107.166,35.592 113.893,35.592 114.081,35.592 ccw(c114.081,35.85) 114.339,35.85 114.339,36.073 cw(c114.858,36.073) 115.377,36.073 115.377,34.85 ccw(c115.635,34.85) 115.893,34.85 115.893,36.073 cw(c116.412,36.073) 116.931,36.073 116.931,34.85 ccw(c117.189,34.85) 117.447,34.85 117.447,35.073 cw(c117.966,35.073) 117.966,35.592 118.545,35.592 125.608,35.592 125.762,35.438 139.244,35.438 141.266,35.438 cw(c141.266,34.919) 141.785,34.919 141.785,33.751 ccw(c142.043,33.751) 142.301,33.751 142.301,35.246 cw(c142.82,35.246) 143.339,35.246 143.339,33.751 ccw(c143.597,33.751) 143.855,33.751 143.855,35.246 cw(c144.374,35.246) 144.893,35.246 144.893,33.751 ccw(c145.151,33.751) 145.409,33.751 145.409,35.246 cw(c145.928,35.246) 146.447,35.246 146.447,33.751 ccw(c146.705,33.751) 146.963,33.751 146.963,35.246 cw(c147.482,35.246) 148.001,35.246 148.001,33.751 ccw(c148.259,33.751) 148.517,33.751 148.517,35.246 cw(c149.036,35.246) 149.555,35.246 149.555,33.751 ccw(c149.813,33.751) 150.071,33.751 150.071,35.246 cw(c150.59,35.246) 151.109,35.246 151.109,33.751 ccw(c151.367,33.751) 151.625,33.751 151.625,34.919 cw(c152.144,34.919) 152.144,35.438 152.333,35.438 158.812,35.438 159.28,35.907 159.28,36.358 162.1,39.177 162.197,39.274 ccw(c161.82,39.65) 162.352,39.65 162.352,41.399 cw(c162.871,41.399) 162.871,41.918 cw(c162.871,41.399) 163.39,41.399 163.39,39.419 ccw(c163.648,39.419) 163.648,39.161 ccw(c163.648,39.419) 163.906,39.419 163.906,41.399 cw(c164.425,41.399) 164.425,41.918 cw(c164.425,41.399) 164.944,41.399 164.944,40.419 ccw(c165.202,40.419) 165.202,40.161 165.659,40.161 165.901,40.161 174.034,40.161 174.295,40.422 174.733,40.422 174.877,40.277 174.979,40.277 175.942,41.24 T_J2.14@176.27,41.24 175.14,40.11 175.14,40.014 175.208,39.946 175.304,39.946 175.435,40.076 177.224,40.076 177.494,39.806 179.23,39.806 179.298,39.874 179.298,39.944 T_R47.2@179.53,40.176
EEM_IO.LVDS_P13: IC13.9 R36.1 T_J2.17 T_R48.2 | length 121.7
  TopLayer w0.116: 148.738,32.307 cw(c148.552,32.128) 148.731,31.943 148.682,31.895 ccw(c149.043,31.522) 148.676,31.154 149.025,30.806 149.118,30.713 149.492,30.339 152.805,30.339 154.161,31.695 154.161,32.49 154.39,32.72 v1(154.39,32.8) ; 148.737,32.308 ccw(c148.552,32.128) 148.373,32.314 148.305,32.248 cw(c147.944,32.621) 147.576,32.255 147.534,32.297 147.531,32.3 147.341,32.3 144.737,32.3 143.9,32.3 143.8,32.2 143.8,31.717 cw(c143.281,31.717) 143.281,31.198 141.748,31.198 ccw(c141.748,30.94) 141.49,30.94 ccw(c141.748,30.94) 141.748,30.682 143.281,30.682 cw(c143.281,30.163) 143.797,30.22 143.8,30.217 143.8,30.2 144,30 144.737,30 145.245,30 145.433,30 ccw(c145.433,30.258) 145.691,30.258 145.691,31.088 cw(c146.21,31.088) 146.729,31.088 146.729,30.258 ccw(c146.987,30.258) 146.987,30 147.974,30 148.108,30 148.347,29.761 153.437,29.761 154.161,29.038 154.161,25.261 153.089,24.189 152.439,24.189 152.371,24.121 152.371,24.081 152.139,23.849 R36.1@152.119,23.849 152.099,23.849 151.867,24.081 151.867,24.121 151.799,24.189 151.298,24.189 149.81,24.188 149.69,24.069 IC13.9@149.35,24.069
  Bottom Layer w0.116: v1(154.39,32.8) 154.39,32.88 154.161,33.11 154.161,33.522 154.538,33.9 154.661,33.9 155.386,33.9 cw(c155.386,33.642) 155.644,33.642 155.644,33.419 ccw(c156.163,33.419) 156.682,33.419 156.682,34.422 cw(c156.94,34.422) 157.198,34.422 157.198,33.419 ccw(c157.717,33.419) 158.236,33.419 158.236,34.422 cw(c158.494,34.422) 158.752,34.422 158.752,33.419 ccw(c159.271,33.419) 159.79,33.419 159.79,33.642 cw(c160.048,33.642) 160.048,33.9 160.236,33.9 160.373,33.9 160.464,33.992 160.559,34.087 161.315,34.842 ccw(c160.948,35.209) 161.353,35.534 161.353,35.538 161.316,35.576 161.122,35.77 cw(c161.304,35.952) 161.122,36.134 cw(c161.304,35.952) 161.487,36.134 163.157,34.464 ccw(c163.524,34.831) 163.89,34.463 163.892,34.465 ccw(c163.524,34.831) 163.891,35.198 162.009,37.08 cw(c162.192,37.262) 162.009,37.445 cw(c162.192,37.262) 162.374,37.445 164.256,35.563 ccw(c164.623,35.93) 164.989,35.562 164.991,35.564 ccw(c164.623,35.93) 164.99,36.297 164.427,36.86 cw(c164.61,37.042) 164.61,37.3 165.168,37.3 165.196,37.3 166.419,37.3 ccw(c166.419,37.819) 166.938,37.819 166.938,38.76 cw(c167.196,38.76) 167.454,38.76 167.454,34.703 ccw(c167.973,34.703) 168.492,34.703 168.492,38.76 cw(c168.75,38.76) 169.008,38.76 169.008,34.703 ccw(c169.527,34.703) 170.046,34.703 170.046,38.76 cw(c170.304,38.76) 170.562,38.76 170.562,34.703 ccw(c171.081,34.703) 171.599,34.703 171.599,38.76 cw(c171.857,38.76) 172.115,38.76 172.115,37.819 ccw(c172.634,37.819) 172.634,37.3 173.6,37.3 174.539,37.3 174.912,36.927 174.912,36.442 174.636,36.167 ; T_J2.17@173.73,36.16 174.685,36.16 174.874,35.971 174.874,35.16 175.33,34.704 177.319,34.704 177.477,34.545 179.23,34.545 179.298,34.478 179.298,34.408 T_R48.2@179.53,34.176
EEM_IO.LVDS_P14: IC46.13 R129.1 T_J2.20 T_R49.2 | length 120.7
  Bottom Layer w0.116: IC46.13@103.959,33.461 103.959,33.121 103.84,33.001 103.84,32.806 104.852,31.794 105.489,31.794 105.826,32.131 R129.1@105.866,32.131 ; R129.1@105.846,32.131 R129.1@105.866,32.131 ; T_J2.20@176.27,33.62 175.317,32.667 ; T_R49.2@179.53,32.676 179.298,32.444 179.298,32.349 179.23,32.281 178.93,32.281 178.3,32.282 178.181,32.4 175.378,32.4 175.304,32.326 175.208,32.326 175.14,32.394 175.14,32.49 175.317,32.667 ; R129.1@105.866,32.131 106.098,31.899 106.098,31.86 106.166,31.792 109.492,31.792 110.776,33.076 127.193,33.076 128.6,31.669 131.931,31.669 133.339,30.261 140.588,30.261 140.776,30.261 ccw(c140.776,30.519) 141.034,30.519 141.034,31.895 cw(c141.553,31.895) 142.072,31.895 142.072,30.2 ccw(c142.33,30.2) 142.588,30.2 142.588,31.895 cw(c143.107,31.895) 143.626,31.895 143.626,30.2 ccw(c143.884,30.2) 144.142,30.2 144.142,31.895 cw(c144.661,31.895) 145.18,31.895 145.18,30.2 ccw(c145.438,30.2) 145.696,30.2 145.696,31.895 cw(c146.215,31.895) 146.734,31.895 146.734,30.2 ccw(c146.992,30.2) 147.25,30.2 147.25,31.895 cw(c147.769,31.895) 148.288,31.895 148.288,30.2 ccw(c148.546,30.2) 148.804,30.2 148.804,31.895 cw(c149.323,31.895) 149.842,31.895 149.842,30.2 ccw(c150.1,30.2) 150.358,30.2 150.358,31.895 cw(c150.877,31.895) 151.396,31.895 151.396,30.519 ccw(c151.654,30.519) 151.654,30.261 152.951,30.261 154.737,30.261 155.388,30.261 ccw(c155.388,30.519) 155.646,30.519 cw(c156.165,30.519) 156.684,30.519 156.684,29.839 ccw(c156.942,29.839) 157.2,29.839 157.2,30.914 cw(c157.719,30.914) 158.238,30.914 158.238,29.519 ccw(c158.496,29.519) 158.754,29.519 158.754,30.914 cw(c159.273,30.914) 159.792,30.914 159.792,29.519 ccw(c160.05,29.519) 160.308,29.519 160.308,29.742 cw(c160.827,29.742) 160.827,30.261 161.015,30.261 163.396,32.642 174.135,32.642 174.305,32.812 174.723,32.812 174.867,32.667 175.317,32.667
EEM_IO.LVDS_P15: IC13.13 R42.1 T_J2.23 T_R50.1 | length 123
  TopLayer w0.116: IC13.13@148.65,26.269 148.65,26.609 148.531,26.729 148.531,27.064 148.685,27.219 149.132,27.219 149.701,27.789 150.099,27.789 150.167,27.721 150.167,27.681 150.399,27.449 R42.1@150.419,27.449 150.439,27.449 150.671,27.681 150.671,27.721 150.739,27.789 151.261,27.789 151.494,27.556 152.19,27.556 152.42,27.327 v1(152.5,27.327)
  Bottom Layer w0.116: v1(152.5,27.327) 152.42,27.327 152.19,27.556 151.563,27.556 151.112,28.006 151.112,28.681 151.592,29.161 152.908,29.161 153.658,28.411 153.9,28.169 154.285,27.785 154.347,27.785 cw(c154.347,27.266) 154.866,27.266 154.866,16.793 ccw(c155.124,16.793) 155.382,16.793 155.382,28.359 cw(c155.901,28.359) 156.42,28.359 156.42,16.592 ccw(c156.678,16.592) 156.936,16.592 156.936,28.359 cw(c157.455,28.359) 157.974,28.359 157.974,26.47 ccw(c158.232,26.47) 158.49,26.47 158.49,28.245 cw(c159.009,28.245) 159.528,28.245 159.528,26.251 ccw(c159.786,26.251) 160.044,26.251 160.044,27.266 cw(c160.563,27.266) 160.563,27.785 160.752,27.785 161.061,27.785 161.499,28.223 161.596,28.32 ccw(c161.219,28.696) 161.752,28.696 161.752,29.245 cw(c162.271,29.245) 162.271,29.764 cw(c162.271,29.245) 162.79,29.245 162.79,28.247 ccw(c163.048,28.247) 163.048,27.989 ccw(c163.048,28.247) 163.306,28.247 163.306,29.523 cw(c163.825,29.523) 163.825,30.042 cw(c163.825,29.523) 164.344,29.523 164.344,28.047 ccw(c164.602,28.047) 164.602,27.789 ccw(c164.602,28.047) 164.86,28.047 164.86,31.077 cw(c165.379,31.077) 165.379,31.596 cw(c165.379,31.077) 165.898,31.077 165.898,28.069 ccw(c166.156,28.069) 166.156,27.811 ccw(c166.156,28.069) 166.414,28.069 166.414,31.432 cw(c166.933,31.432) 166.933,31.951 cw(c166.933,31.432) 167.452,31.432 167.452,29.019 ccw(c167.71,29.019) 167.71,28.761 168.06,28.761 168.303,28.761 168.807,28.761 168.961,28.761 169.178,28.978 ccw(c168.995,29.16) 169.253,29.16 169.253,31.32 cw(c169.772,31.32) 170.291,31.32 170.291,29.417 ccw(c170.549,29.417) 170.549,29.159 171.041,29.159 171.642,28.558 171.7,28.5 172.443,27.757 172.8,27.4 174.47,27.4 174.87,27.8 174.87,28.2 174.636,28.433 173.837,28.433 T_J2.23@173.73,28.54 174.802,28.54 174.87,28.608 174.87,29.308 175.422,29.861 177.408,29.861 177.839,29.43 179.23,29.43 179.298,29.498 179.298,29.568 T_R50.1@179.53,29.8
GA0: T_R13.1 T_R31.1 T_T2.1 | length 16
  TopLayer w0.2: T_T2.1@168.668,6.478 169.918,6.478 T_R31.1@169.936,6.496 170.896,6.496 v1(170.9,6.5) ; v1(182.6,8.8) T_R13.1@183.33,8.8
  L4 w0.2: v1(170.9,6.5) 172.18,7.78 172.515,7.78 172.735,8 178.426,8 178.901,7.525 180.531,7.525 181.806,8.8 v1(182.6,8.8)
GA1: T_R14.1 T_R32.1 T_T3.1 | length 20.4
  TopLayer w0.2: T_T3.1@168.682,2.9 168.732,2.85 T_R32.1@169.955,2.85 170.75,2.85 v1(170.8,2.8) ; v1(182.6,9.8) T_R14.1@183.33,9.8
  L4 w0.2: v1(170.8,2.8) 179.3,2.8 183.359,6.859 183.359,9.107 182.667,9.8 v1(182.6,9.8)
GA2: T_R16.1 T_R33.1 T_T4.1 | length 31
  TopLayer w0.2: v1(157.457,3.658) 157.475,3.676 158.394,3.676 T_R33.1@158.4,3.67 159.588,3.67 T_T4.1@159.618,3.7 ; v1(182.6,10.7) 183.308,10.7 T_R16.1@183.334,10.726
  L4 w0.2: v1(157.457,3.658) 162.658,3.658 169.7,10.7 v1(182.6,10.7)
GA3: T_R18.1 T_R34.1 T_T5.1 | length 29.4
  TopLayer w0.15: v1(157.6,7.4) 158.27,7.4 T_R34.1@158.3,7.37 158.33,7.4 T_T5.1@159.618,7.4 ; v1(182.3,11.7) T_R18.1@183.13,11.7
  L4 w0.15: v1(157.6,7.4) 163.3,7.4 167.2,11.3 181.9,11.3 v1(182.3,11.7)

## Text inside footprints (layer, text, board x,y; h text height)
T_J5: TopOverlay "7" at 194.853,87.6 h1 r90; TopOverlay "8" at 194.853,89.6 h1 r90; TopOverlay "6" at 194.853,85.6 h1 r90; TopOverlay "5" at 194.853,83.6 h1 r90; TopOverlay "4" at 194.853,81.6 h1 r90; TopOverlay "3" at 194.853,79.6 h1 r90; TopOverlay "2" at 194.853,77.6 h1 r90; TopOverlay "1" at 194.853,75.6 h1 r90; TopOverlay "L" at 199.903,73.75 h1 r90; TopOverlay "K" at 201.303,73.75 h1 r90; TopOverlay "J" at 202.703,73.75 h1 r90; TopOverlay "I" at 204.103,74 h1 r90; TopOverlay "H" at 205.503,73.75 h1 r90; TopOverlay "G" at 206.903,73.75 h1 r90; TopOverlay "F" at 208.303,73.75 h1 r90; TopOverlay "E" at 209.703,73.75 h1 r90; TopOverlay "D" at 211.103,73.75 h1 r90; TopOverlay "C" at 212.503,72.75 h1 r90; TopOverlay "B" at 213.903,72.75 h1 r90; TopOverlay "A" at 215.303,72.75 h1 r90; Drill Drawing "Diam. 0.5mm +/-0.05" at 215.553,93.95 h1 r180; Drill Drawing "PRESS-FIT TECHNOLOGY" at 215.553,92.45 h1 r180; Mechanical 14 "7" at 194.853,87.6 h1 r90; Mechanical 14 "8" at 194.853,89.6 h1 r90; Mechanical 14 "6" at 194.853,85.6 h1 r90; Mechanical 14 "5" at 194.853,83.6 h1 r90; Mechanical 14 "4" at 194.853,81.6 h1 r90; Mechanical 14 "3" at 194.853,79.6 h1 r90; Mechanical 14 "2" at 194.853,77.6 h1 r90; Mechanical 14 "1" at 194.853,75.6 h1 r90; Mechanical 14 "L" at 199.903,73.75 h1 r90; Mechanical 14 "K" at 201.303,73.75 h1 r90; Mechanical 14 "J" at 202.703,73.75 h1 r90; Mechanical 14 "I" at 204.103,74 h1 r90; Mechanical 14 "H" at 205.503,73.75 h1 r90; Mechanical 14 "G" at 206.903,73.75 h1 r90; Mechanical 14 "F" at 208.303,73.75 h1 r90; Mechanical 14 "E" at 209.703,73.75 h1 r90; Mechanical 14 "D" at 211.103,73.75 h1 r90; Mechanical 14 "C" at 212.503,72.75 h1 r90; Mechanical 14 "B" at 213.903,72.75 h1 r90; Mechanical 14 "A" at 215.303,72.75 h1 r90; Mechanical 8 "Edge of Daugher Card" at 217.653,79.725 h0.5 r90; Mechanical 8 "Top Surface of Mother Board" at 229.153,78.575 h0.5 r90
T_J6: TopOverlay "1" at 201.8,72.275 h1.2 r270; Mechanical 14 "1" at 201.8,72.275 h1.2 r270